# Altium PCB Telephone Circuit v1.0.PcbDoc (part 4 of 5)
Units mil, origin at the board's own origin, x right, y up, seen from the top; angles counter-clockwise.
Board outline 3149.61 x 2952.76 mil, 2 copper layers (Top Layer, Bottom Layer), stack 61.855 mil thick; 194 components, 119 nets, 557 pads, 213 vias.
Unrouted connection lines stored in the file: 77.
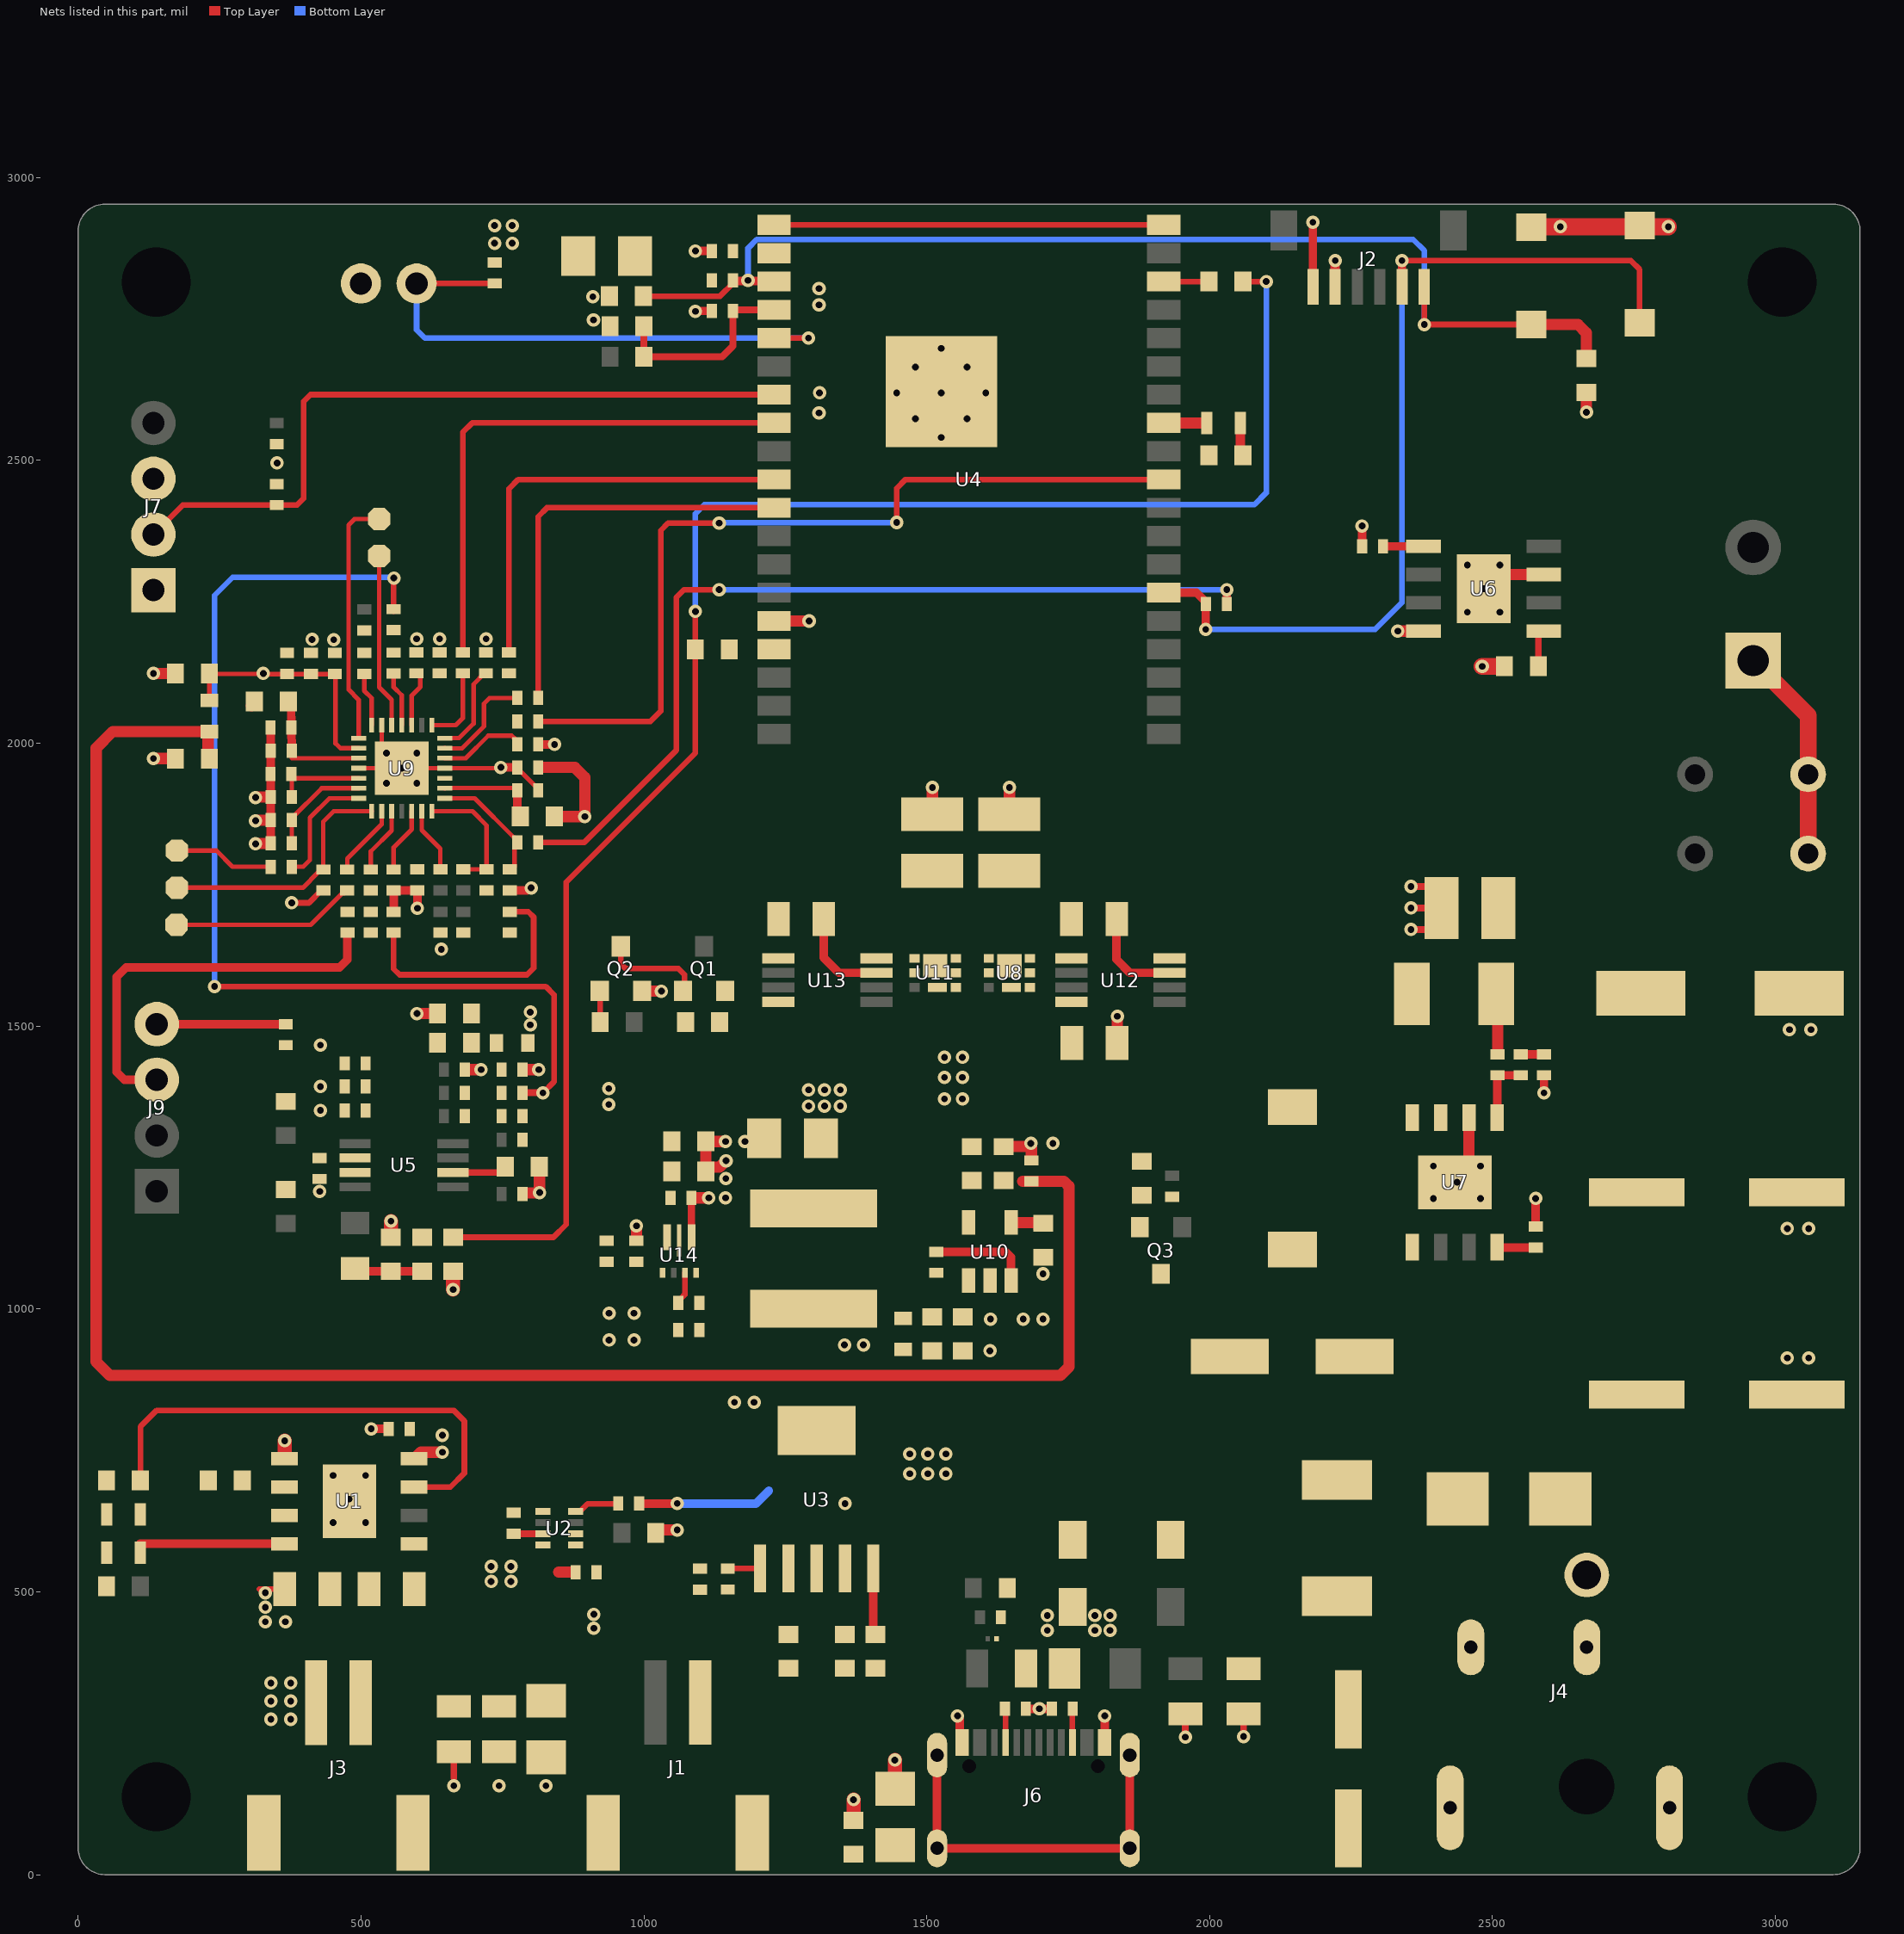
[diagram p2: the nets of this part, all layers, seen from the top]

## Part data (continued)
R34: library part RC0402FR-076K2L, "RES 6.2K OHM 1% 1/16W 0402", Case Code (Imperial)=0402, Case Code (Metric)=1005, LCSC Part Number=C137946, Manufacturer=Yageo, Max Operating Temperature=155°C, Max Power Dissipation=63mW, Min Operating Temperature=-55°C, Package Quantity=1, Resistance Tolerance=1%, Resistor Type="Thick Film", Temperature Coefficient=100ppm/°C, Voltage Rating=50V, Case/Package=0402, ComponentLink1Description=https://datasheet.ciiva.com/7850/1018594-7850076.pdf?src-supplier=Element14, ComponentLink1URL=https://datasheet.ciiva.com/7850/1018594-7850076.pdf?src-supplier=Element14, ComponentLink2Description=https://datasheet.ciiva.com/7850/1018594-7850077.pdf?src-supplier=Element14, ComponentLink2URL=https://datasheet.ciiva.com/7850/1018594-7850077.pdf?src-supplier=Element14, Construction=Rectangular, Depth=0.5mm, Features="Moisture Resistant", Height=0.016inch, Item Type=Resistors, Lead Free="Lead Free", Length=1mm, Manufacturer Part Number=RC0402FR-076K2L, Military Standard=Not, Number of Terminations=2, Packaging="Tape and Reel", Power Rating=63mW, Pricing="100=0.034, 1000=0.032, 2500=0.031, 5000=0.028, 10000=0.026 (DKK)", Reach SVHC Compliant=Unknown, RoHS=Yes, RoHS Compliant=Yes, Series=RC, Stock=13400, Supplier=Rs, Termination=SMD/SMT, Tolerance=1%, Voltage Rating (DC)=50V, Width=0.02inch
R35: library part ERJ-2GEJ132X, "RES SMD 1.3K OHM 5% 1/10W 0402"
R36: library part 0402WGD8060TCE, "62.5mW Thick Film Resistors 50V ±100ppm/℃ ±0.5% 806Ω 0402 Chip Resistor - Surface Mount ROHS", LCSC Part Number=C423268, Manufacturer=UNI-ROYAL, Package=0402, ComponentLink1Description=LCSC, ComponentLink1URL=https://www.lcsc.com/product-detail/Chip-Resistor-Surface-Mount_UNI-ROYAL-Uniroyal-Elec-0402WGD8060TCE_C423268.html, Item Type=Resistor, Manufacturer Part Number=0402WGD8060TCE
R37: library part CRCW12060000Z0EA, "RES SMD 0 OHM JUMPER 1/4W 1206", Case Code (Imperial)=1206, Case Code (Metric)=3216, LCSC Part Number=C190124, Manufacturer=Vishay, Max Operating Temperature=155°C, Max Power Dissipation=250mW, Min Operating Temperature=-55°C, Package Quantity=5000, Ratings=AEC-Q200, Resistor Type="Thick Film", Temperature Coefficient=100ppm/°C, Tolerance=1%, Voltage Rating=200V, Case/Package=1206, ComponentLink1Description=https://datasheet.ciiva.com/7841/1720486-7841862.pdf?src-supplier=Element14, ComponentLink1URL=https://datasheet.ciiva.com/7841/1720486-7841862.pdf?src-supplier=Element14, Construction=Rectangular, Contact Plating=Tin, Depth=1.6mm, Features="Automotive AEC-Q200", Height=0.55mm, Item Type=Resistor, Lead Free=5697LeadFree, Length=3.2mm, Manufacturer Part Number=CRCW12060000Z0EA, Military Standard=Not, Number of Terminations=2, Packaging="Tape and Reel", Power Rating=250mW, Pricing="1=0.1, 10=0.039, 50=0.039, 100=0.018, 1000=0.013, 10000=0.007 (USD)", Radiation Hardening=No, Reach SVHC Compliant=Unknown, RoHS=Yes, RoHS Compliant=Yes, Series=CRCW, Stock=852938, Supplier=Mouser, Technology="THICK FILM", Termination=SMD/SMT, Voltage Rating (DC)=200V, Weight=0.000353oz, Width=1.6mm
R39: library part RC0603FR-0747RL, "RES SMD 47OHM 0.1W 0603", Case Code (Imperial)=0603, Case Code (Metric)=1608, LCSC Part Number=C114623, Manufacturer=Yageo, Max Operating Temperature=155°C, Max Power Dissipation=100mW, Min Operating Temperature=-55°C, Package Quantity=1, Resistance Tolerance=1%, Resistor Type="Thick Film", Supplier Part Number 1=311-47.0HRCT-ND, Temperature Coefficient=100ppm/°C, Voltage Rating=75V, Voltage Rating (DC)=50V, Case/Package=0603, Category="Chip SMD Resistors", ComponentLink1Description=https://datasheet.ciiva.com/2453/pyu-r-int-thick-7-2453922.pdf?src-supplier=Digi-Key, ComponentLink1URL=https://datasheet.ciiva.com/2453/pyu-r-int-thick-7-2453922.pdf?src-supplier=Digi-Key, ComponentLink2Description=https://datasheet.ciiva.com/2453/pyu-r-int-thick-7-2453923.pdf?src-supplier=Digi-Key, ComponentLink2URL=https://datasheet.ciiva.com/2453/pyu-r-int-thick-7-2453923.pdf?src-supplier=Digi-Key, ComponentLink3Description=https://datasheet.ciiva.com/2453/pyu-r-int-thick-7-2453924.pdf?src-supplier=Digi-Key, ComponentLink3URL=https://datasheet.ciiva.com/2453/pyu-r-int-thick-7-2453924.pdf?src-supplier=Digi-Key, ComponentLink4Description=https://datasheet.ciiva.com/7746/443971-7746363.pdf?src-supplier=Element14, ComponentLink4URL=https://datasheet.ciiva.com/7746/443971-7746363.pdf?src-supplier=Element14, ComponentLink5Description=https://datasheet.ciiva.com/7746/443971-7746364.pdf?src-supplier=Element14, ComponentLink5URL=https://datasheet.ciiva.com/7746/443971-7746364.pdf?src-supplier=Element14, ComponentLink6Description=https://datasheet.ciiva.com/46440/1868787-46440908.pdf?src-supplier=Element14, ComponentLink6URL=https://datasheet.ciiva.com/46440/1868787-46440908.pdf?src-supplier=Element14, Construction=Rectangular, Depth=0.8mm, Features="Moisture Resistant", Height=0.022inch, Lead Free="Lead Free", Length=1.6mm, Manufacturer Part Number=RC0603FR-0747RL, Military Standard=Not, Number of Pins=2, Number of Terminations=2, Packaging="Tape and Reel", Power Rating=100mW, Pricing 1="1=0.10000, 10=0.02400, 100=0.00970, 1000=0.00436, 2500=0.00378 (USD)", REACH SVHC=Unknown, Resistance=47R, RoHS=Yes, RoHS Compliant=Yes, Series=RC, Size Code=0603, Stock 1=596562, Supplier 1=Digi-Key, Termination=SMD/SMT, Tolerance=1%, Weight=7.1E-05oz, Width=0.8mm
R40: library part RC0603FR-074R7L, "RES 4.7 OHM 1% 1/10W 0603", Case Code (Imperial)=0603, Case Code (Metric)=1608, LCSC Part Number=C137705, Manufacturer=Yageo, Max Operating Temperature=155°C, Max Power Dissipation=100mW, Min Operating Temperature=-55°C, Package Quantity=5000, Resistance Tolerance=1%, Resistor Type="Thick Film", Supplier Part Number 1=3598901, Temperature Coefficient=200ppm/°C, Voltage Rating=50V, Case/Package=0603, Category="Chip SMD Resistors", ComponentLink1Description=https://datasheet.ciiva.com/46440/1868787-46440910.pdf?src-supplier=Element14, ComponentLink1URL=https://datasheet.ciiva.com/46440/1868787-46440910.pdf?src-supplier=Element14, ComponentLink2Description=https://datasheet.ciiva.com/12555/rc0603-272842-12555071.pdf?src-supplier=Mouser, ComponentLink2URL=https://datasheet.ciiva.com/12555/rc0603-272842-12555071.pdf?src-supplier=Mouser, Features="Moisture Resistant", Height=0.45mm, Item Type=Resistor, Lead Free="Lead Free", Length=1.6mm, Manufacturer Part Number=RC0603FR-074R7L, Number of Terminations=2, Packaging="Tape and Reel", Pins=2, Power Rating=100mW, Pricing 1="5000=0.0036, 25000=0.0034, 125000=0.0032, 250000=0.0031, 750000=0.0029 (USD)", Reach SVHC Compliant=Unknown, RoHS=Yes, Series=RC, Stock 1=160000, Supplier 1="Future Electronics", Termination=SMD/SMT, Tolerance=1%, Voltage Rating (DC)=50V, Width=0.8mm
R42 R44: library part RC0402FR-07100RL, "RES 100 OHM 1% 1/16W 0402", Case Code (Imperial)=0402, Case Code (Metric)=1005, LCSC Part Number=C106232, Manufacturer=Yageo, Max Operating Temperature=155°C, Max Power Dissipation=63mW, Min Operating Temperature=-55°C, Power Rating=62.5mW, Resistance Tolerance=1%, Resistor Type="Thick Film", Supplier Part Number 1=603-RC0402FR-07100RL, Temperature Coefficient=100ppm/°C, Voltage Rating=50V, Case/Package=0402, Category="Chip SMD Resistors", ComponentLink1Description=https://datasheet.ciiva.com/11808/0900766b80c66297-11808765.pdf?src-supplier=RSComponents, ComponentLink1URL=https://datasheet.ciiva.com/11808/0900766b80c66297-11808765.pdf?src-supplier=RSComponents, ComponentLink2Description=https://datasheet.ciiva.com/7849/1784430-7849810.pdf?src-supplier=Element14, ComponentLink2URL=https://datasheet.ciiva.com/7849/1784430-7849810.pdf?src-supplier=Element14, ComponentLink3Description=https://datasheet.ciiva.com/28367/1018594-28367226.pdf?src-supplier=Element14, ComponentLink3URL=https://datasheet.ciiva.com/28367/1018594-28367226.pdf?src-supplier=Element14, ComponentLink4Description=https://datasheet.ciiva.com/22747/1018594-22747511.pdf?src-supplier=Element14, ComponentLink4URL=https://datasheet.ciiva.com/22747/1018594-22747511.pdf?src-supplier=Element14, ComponentLink5Description=https://datasheet.ciiva.com/12667/pyu-rc0402-51-rohs-l-6-r-12667957.pdf?src-supplier=Mouser, ComponentLink5URL=https://datasheet.ciiva.com/12667/pyu-rc0402-51-rohs-l-6-r-12667957.pdf?src-supplier=Mouser, ComponentLink6Description=https://datasheet.ciiva.com/15189/getdatasheetpartid-329466-15189335.pdf?src-supplier=Verical, ComponentLink6URL=https://datasheet.ciiva.com/15189/getdatasheetpartid-329466-15189335.pdf?src-supplier=Verical, ComponentLink7Description=https://datasheet.ciiva.com/16740/pyu-rc0402-51-rohs-l-6-r-16740566.pdf?src-supplier=Future+Electronics, ComponentLink7URL=https://datasheet.ciiva.com/16740/pyu-rc0402-51-rohs-l-6-r-16740566.pdf?src-supplier=Future+Electronics, Construction=Rectangular, Depth=0.5mm, Features="Moisture Resistant", Height=0.32mm, Item Type=Resistor, Lead Free="Lead Free", Length=1mm, Manufacturer Part Number=RC0402FR-07100RL, Military Standard=Not, Number of Pins=2, Number of Terminations=2, Packaging="Tape and Reel", Pricing 1="1=0.10000, 10=0.01200, 50=0.01200, 100=0.00500, 1000=0.00300, 2500=0.00200, 10000=0.00100 (USD)", REACH SVHC="No SVHC", Resistance=100R, RoHS=Yes, RoHS Compliant=Yes, Series=RC, Size Code=0402, Stock 1=699545, Supplier 1=Mouser, Technology="THICK FILM", Termination=SMD/SMT, Tolerance=1%, Voltage Rating (DC)=50V, Width=0.5mm
R52 R55: library part RC0402FR-07100KL, "RES 100K OHM 1% 1/16W 0402", Case Code (Imperial)=0402, Case Code (Metric)=1005, LCSC Part Number=C60491, Manufacturer=Yageo, Max Operating Temperature=155°C, Max Power Dissipation=63mW, Min Operating Temperature=-55°C, Package Quantity=1, Resistance=100kR, Resistance Tolerance=1%, Resistor Type="Thick Film", Supplier Part Number 1=603-RC0402FR-07100KL, Temperature Coefficient=100ppm/°C, Voltage Rating=50V, Case/Package=0402, Category="Chip SMD Resistors", ComponentLink1Description=https://datasheet.ciiva.com/11819/0900766b80c66297-11819452.pdf?src-supplier=RSComponents, ComponentLink1URL=https://datasheet.ciiva.com/11819/0900766b80c66297-11819452.pdf?src-supplier=RSComponents, ComponentLink2Description=https://datasheet.ciiva.com/22747/1018594-22747509.pdf?src-supplier=Element14, ComponentLink2URL=https://datasheet.ciiva.com/22747/1018594-22747509.pdf?src-supplier=Element14, ComponentLink3Description=https://datasheet.ciiva.com/2453/pyu-r-int-thick-7-2453362.pdf?src-supplier=Digi-Key, ComponentLink3URL=https://datasheet.ciiva.com/2453/pyu-r-int-thick-7-2453362.pdf?src-supplier=Digi-Key, ComponentLink4Description=https://datasheet.ciiva.com/2453/pyu-r-int-thick-7-2453363.pdf?src-supplier=Digi-Key, ComponentLink4URL=https://datasheet.ciiva.com/2453/pyu-r-int-thick-7-2453363.pdf?src-supplier=Digi-Key, ComponentLink5Description=https://datasheet.ciiva.com/2453/pyu-r-int-thick-7-2453361.pdf?src-supplier=Digi-Key, ComponentLink5URL=https://datasheet.ciiva.com/2453/pyu-r-int-thick-7-2453361.pdf?src-supplier=Digi-Key, ComponentLink6Description=https://datasheet.ciiva.com/12667/pyu-rc0402-51-rohs-l-6-r-12667930.pdf?src-supplier=Mouser, ComponentLink6URL=https://datasheet.ciiva.com/12667/pyu-rc0402-51-rohs-l-6-r-12667930.pdf?src-supplier=Mouser, ComponentLink7Description=https://datasheet.ciiva.com/15189/getdatasheetpartid-323696-15189334.pdf?src-supplier=Verical, ComponentLink7URL=https://datasheet.ciiva.com/15189/getdatasheetpartid-323696-15189334.pdf?src-supplier=Verical, Construction=Rectangular, Depth=0.5mm, Features="Moisture Resistant", Height=0.016inch, Item Type=Resistor, Lead Free="Lead Free", Length=0.039inch, Manufacturer Part Number=RC0402FR-07100KL, Military Standard=Not, Number of Terminations=2, Packaging="Tape and Reel", Power Rating=63mW, Pricing 1="1=0.10000, 10=0.01200, 50=0.01200, 100=0.00500, 1000=0.00300, 2500=0.00200, 10000=0.00100 (USD)", REACH SVHC="No SVHC", RoHS=Yes, RoHS Compliant=Yes, Series=RC, Stock 1=7759549, Supplier 1=Mouser, Technology="THICK FILM", Termination=SMD/SMT, Tolerance=1%, Width=0.02inch, Working Voltage=50V
R53: library part RC0603JR-070RL, "RES 0 OHM JUMPER 1/10W 0603", Case Code (Imperial)=0603, Case Code (Metric)=1608, LCSC Part Number=C95177, Manufacturer=Yageo, Max Operating Temperature=155°C, Max Power Dissipation=100mW, Min Operating Temperature=-55°C, Package Quantity=5000, Resistance=0mR, Resistance Tolerance=5%, Resistor Type="Thick Film", Supplier Part Number 1=311-0.0GRCT-ND, Temperature Coefficient=200ppm/°C, Tolerance=1%, Voltage Rating=50V, Case/Package=0603, Category="Chip SMD Resistors", Construction=Rectangular, Contact Plating=Tin,Matte, Depth=0.8mm, Features="Moisture Resistant", Height=0.45mm, Item Type=Resistor, Lead Free="Lead Free", Length=1.6mm, Manufacturer Part Number=RC0603JR-070RL, Military Standard=Not, Number of Pins=2, Number of Terminations=2, Packaging="Tape and Reel", Power Rating=100mW, Pricing 1="1=0.10000, 10=0.01700, 25=0.01240, 50=0.00960, 100=0.00700, 250=0.00536, 500=0.00430, 1000=0.00316 (USD)", Radiation Hardening=No, Reach SVHC Compliant="No SVHC", RoHS=Yes, RoHS Compliant=Yes, Series=RC, Size Code=0603, Stock 1=18081776, Supplier 1=Digi-Key, Technology="THICK FILM", Termination=SMD/SMT, Voltage Rating (DC)=50V, Width=0.8mm
R54: library part RC-02W7323FT, "62.5mW Thick Film Resistors ±1% ±200ppm/℃ 732kΩ 0402 Chip Resistor - Surface Mount ROHS", JLCPCB Part Number=C321608, Manufacturer="FH (Guangdong Fenghua Advanced Tech)", Package=Res-0402, Item Type=Resistor, Manufacturer Part Number=RC-02W7323FT
SW1 SW2: "Without bracket 50mA 4mm 100000 Times 12V 160gf 3mm 2mm Round Button Standing paste SPST SMD Tactile Switches ROHS", LCSC Part Number=C720477, Manufacturer=XUNPU, Package=SMD, ComponentLink1Description=LCSC, ComponentLink1URL=https://www.lcsc.com/product-detail/Tactile-Switches_XUNPU-TS-1088-AR02016_C720477.html?s_z=n_TS-1088-AR02016, Item Type="Tactile Switch", Manufacturer Part Number=TS-1088-AR02016
TP1 TP2 TP3 TP4 TP5: "Test Point ON", Item Type="Test Point", Manufacturer Part Number="TEST POINT 0.5mm Dia"
U1: "ESOP-8 Battery Management ICs ROHS", LCSC Part Number=C16581, Manufacturer=TOPPOWER, Package=ESOP-8, ComponentLink1Description=LCSC, ComponentLink1URL=https://www.lcsc.com/product-detail/Battery-Management-ICs_TOPPOWER-Nanjing-Extension-Microelectronics-TP4056-42-ESOP8_C16581.html, Item Type=IC, Manufacturer Part Number=TP4056-42-ESOP8
U2: "OR Controller N+1 ORing Controller N-Channel 2:1 SOT-583", LCSC Part Number=C3235556, Manufacturer="Texas Instruments", Supplier Part Number 1=595-LM66200DRLR, Category="Integrated Circuits (ICs)", Item Type=IC, Manufacturer Part Number=LM66200DRLR, Pricing 1="1=0.80000, 10=0.70000, 50=0.65800, 100=0.53700, 1000=0.34000, 10000=0.30700 (USD)", RoHS=No, Stock 1=11717, Supplier 1=Mouser
U3: "IC REG LINEAR 3.3V 1A SOT223-6", LCSC Part Number=C485803, Manufacturer="Texas Instruments", Supplier Part Number=595-TPS79633DCQR, Category="Voltage Regulators - Linear", ComponentLink1Description=https://datasheet.ciiva.com/2045/tps79601-2045264.pdf?src-supplier=Digi-Key, ComponentLink1URL=https://datasheet.ciiva.com/2045/tps79601-2045264.pdf?src-supplier=Digi-Key, ComponentLink2Description=https://datasheet.ciiva.com/22704/1846966-22704703.pdf?src-supplier=Element14, ComponentLink2URL=https://datasheet.ciiva.com/22704/1846966-22704703.pdf?src-supplier=Element14, ComponentLink3Description=https://datasheet.ciiva.com/41462/001015136-da-01-en-ic-reg-ldo-3-3v-1-tps79633dcqr-sot-6-tid-41462982.pdf?src-supplier=Conrad, ComponentLink3URL=https://datasheet.ciiva.com/41462/001015136-da-01-en-ic-reg-ldo-3-3v-1-tps79633dcqr-sot-6-tid-41462982.pdf?src-supplier=Conrad, Item Type=IC, Length=6.5mm, Manufacturer Part Number=TPS79633DCQR, Pricing="1=3.24, 10=2.75, 50=2.75, 100=2.39, 1000=1.72, 10000=1.56 (USD)", RoHS=Yes, Stock=3089, Supplier=Mouser, Thickness=1.6mm, Width=3.5mm
U4: "RF TXRX MODULE BT PCB TRACE SMD", LCSC Part Number=C529589, Manufacturer="Espressif Systems", Supplier Part Number=1965-ESP32-WROVER-E-N16R8CT-ND, Category=Uncategorized, Item Type=Module, Manufacturer Part Number=ESP32-WROVER-E-N16R8, Pricing="1=3.28 (USD)", RoHS=No, Stock=11720, Supplier=Digi-Key
U5: "3Wx1@4Ω Class D MSOP-8 Audio Power OpAmps ROHS", LCSC Part Number=C189961, Manufacturer="Shenzhen Nsiway Tech", Package=MSOP-8, ComponentLink1Description=LCSC, ComponentLink1URL=https://www.lcsc.com/product-detail/Audio-Power-OpAmps_Shenzhen-Nsiway-Tech-NS4150B_C189961.html, Item Type=IC, Manufacturer Part Number=NS4150B
U6: "48-V, 3.5-A H BRIDGE MOTOR DRIVE", LCSC Part Number=C5218844, Manufacturer="Texas Instruments", Height=1.7mm, Item Type=IC, Length=4.89mm, Manufacturer Part Number=DRV8251ADDAR, Pins=8NUMBER, Pricing="1=1.78, 10=1.309, 25=1.1904, 100=1.0602, 250=0.99812, 500=0.96074, 1000=0.92996 (USD)", RoHS=No, Supplier=Digikey, Thickness=1.48mm, Width=3.9mm
U7: "Boost type Adjustable 500mA 3V~60V 3V~60V ESOP-8 DC-DC Converters ROHS", LCSC Part Number=C5280693, Manufacturer=Legend-Si, Package=ESOP-8, ComponentLink1Description=LCSC, ComponentLink1URL=https://www.lcsc.com/product-detail/DC-DC-Converters_Legend-Si-LGS6302EP_C5280693.html, Item Type=IC, Manufacturer Part Number=LGS6302EP
U8 U11: "30V 5A 2.3W 30mΩ@4A,8V null WSON-6 MOSFETs ROHS", LCSC Part Number=C2863837, Manufacturer="Texas Instruments", Supplier Part Number=595-CSD17313Q2, Category=MOSFETs, ComponentLink1Description=https://datasheet.ciiva.com/6388/csd17313q2-6388183.pdf?src-supplier=Digi-Key, ComponentLink1URL=https://datasheet.ciiva.com/6388/csd17313q2-6388183.pdf?src-supplier=Digi-Key, ComponentLink2Description=https://datasheet.ciiva.com/4438/slps260b-128048-4438543.pdf?src-supplier=Mouser, ComponentLink2URL=https://datasheet.ciiva.com/4438/slps260b-128048-4438543.pdf?src-supplier=Mouser, ComponentLink3Description=https://datasheet.ciiva.com/1255/csd17313q2-1255358.pdf?src-supplier=Newark, ComponentLink3URL=https://datasheet.ciiva.com/1255/csd17313q2-1255358.pdf?src-supplier=Newark, ComponentLink4Description=https://datasheet.ciiva.com/7968/1536237-7968249.pdf?src-supplier=Element14, ComponentLink4URL=https://datasheet.ciiva.com/7968/1536237-7968249.pdf?src-supplier=Element14, Item Type=IC, Manufacturer Part Number=CSD17313Q2, Pricing="1=0.59, 10=0.502, 50=0.502, 100=0.375, 1000=0.228, 10000=0.156 (USD)", RoHS=Yes, Stock=12528, Supplier=Mouser
U9: "QFN-28-EP(4x4) ADCs/DACs - Special Purpose ROHS", LCSC Part Number=C365736, Manufacturer=Everest-semi, Package=QFN-28-EP(4x4), ComponentLink1Description=LCSC, ComponentLink1URL=https://www.lcsc.com/product-detail/ADCs-DACs-Special-Purpose_Everest-semi-Everest-Semiconductor-ES8388_C365736.html, Item Type=IC, Manufacturer Part Number=ES8388
U10: "IC REG LDO 3.3V 0.3A SOT23-5", Manufacturer=Richtek, Supplier Part Number=1028-1014-1-ND, Category="Voltage Regulators - Linear", ComponentLink1Description=https://datasheet.ciiva.com/2046/3d3futf-83fb3frfm5mtkzlte2lnbkzg3d3d3f3d-2046896.pdf?src-supplier=Digi-Key, ComponentLink1URL=https://datasheet.ciiva.com/2046/3d3futf-83fb3frfm5mtkzlte2lnbkzg3d3d3f3d-2046896.pdf?src-supplier=Digi-Key, ComponentLink2Description=https://datasheet.ciiva.com/28652/1782157-28652989.pdf?src-supplier=Element14, ComponentLink2URL=https://datasheet.ciiva.com/28652/1782157-28652989.pdf?src-supplier=Element14, Manufacturer Part Number=RT9193-33GB, Pricing="1=0.53, 10=0.454, 25=0.424, 100=0.3394, 250=0.31512, 500=0.26664, 1000=0.20604 (USD)", RoHS=Yes, Stock=7748, Supplier=Digi-Key
U12 U13: "IC SMART DIODE CTLR 8VSSOP", Case/Package=VSSOP, Manufacturer="Texas Instruments", Max Operating Temperature=125°C, Min Operating Temperature=-40°C, Operating Supply Current=0A, Package Quantity=2500, Quiescent Current=0pA, Supplier Part Number=595-LM74610QDGKRQ1, Category="Power Management ICs", ComponentLink1Description=http://www.ti.com/lit/ds/symlink/lm74610-q1.pdf?src-supplier=Digikey, ComponentLink1URL=http://www.ti.com/lit/ds/symlink/lm74610-q1.pdf?src-supplier=Digikey, Item Type=IC, Lead Free="Lead Free", Manufacturer Part Number=LM74610QDGKRQ1, Mounting Technology="Surface Mount", Packaging="Cut Tape", Pins=8, Pricing="1=2.47, 10=2.1, 50=2.1, 100=1.79, 1000=1.2, 10000=1.08 (USD)", RoHS=Yes, RoHS Compliant=Yes, Series="Automotive, AEC-Q100", Stock=4920, Supplier=Mouser, Weight=0.005997oz
U14: "8-A boost converter with 0.5-V ultra-low input voltage 7-VQFN-HR -40 to 125", LCSC Part Number=C915088, Manufacturer="Texas Instruments", Supplier Part Number 1=296-TPS61022RWURDKR-ND, Category="Voltage Regulators - Switching", ComponentLink1Description=LCSC, ComponentLink1URL=https://www.lcsc.com/product-detail/DC-DC-Converters_Texas-Instruments-TPS61022RWUR_C915088.html, Item Type=IC, Manufacturer Part Number=TPS61022RWUR, Pricing 1="1=1.88000, 10=1.68800, 25=1.59280, 100=1.35690, 250=1.27412, 500=1.11486, 1000=0.92374 (USD)", RoHS=Yes, Supplier 1=Digi-Key

## Free pads (board coordinates)
  round 0 hole 122.05 unplated: S22(137.8,137.8) S22(137.8,2814.96) S22(3011.81,137.8) S22(3011.81,2814.96)

## Via types
v1: diameter 23.62, hole 11.81, Top Layer to Bottom Layer, tented both sides, 213 vias

## Nets (pads, with @x,y where several pads share a name; then routed paths per layer and width w, separated by ;. In a path a pad name is that pad's centre, name@x,y a point inside that pad or via, vN(x,y) a via of type N, cw(c..) or ccw(c..) an arc to the next point about the centre after c; other vN are vias at no path point)
3.3V##: C30.2 C67.2 C69.2 C70.2 C71.2 FB3.2 R28.1 R39.1 R41.2 R43.2 U9.16 | length 692.1
  Top Layer w8: C67.2@231.73,2123.35 231.96,2123.12 FB3.2@231.96,2075.65 ; C67.2@232.56,2122.52 v1@328.58,2122.52 ; v1(327.25,2123.35) 328.58,2122.02 C69.2@414.17,2122.02 ; C70.2@369.28,2122.52 C69.2@411.28,2122.52 ; C69.2@411.78,2122.02 C69.2@414.17,2122.02 ; C30.2@453.67,2122.02 417.66,2122.02 C69.2@414.17,2122.02 ; C30.2@455.01,2122.02 455.01,1999.68 463.46,1991.23 U9.16@495.81,1991.23
  Top Layer w20: C71.2@815.79,1957.23 878.11,1957.23 895.52,1939.82 v1(895.52,1870.36) R39.1@841.64,1870.36
  other v1: 641.8,1635.71
3V3: C7.2 C13.2 C14.2 J2.1 R4.1 R6.2 R18.2 R19.2 R22.2 U3.4 U4.2 U6.4 | length 398.8
  Top Layer w15: R4.1@991.5,656 991.57,655.93 1058.81,655.93 v1(1058.88,656) ; J2.1@2182.42,2806.76 v1(2182.42,2921)
  Top Layer w20: v1(2332.5,2198.19) U6.4@2377.91,2198.19
  Bottom Layer w15: v1(1058.88,656) 1059.03,655.85 1198.04,655.85 1220.91,678.72 ; v1@1355.29,655.93 v1(1355.36,655.85)
  other v1: 351.65,2495.25 736,2883.87 767.13,2883.87 736,2915 767.13,2915
3V3#: C51.2 C52.2 C74.1 C76.1 FB3.1 R40.2 U10.5 | length 3494.6
  Top Layer w20: C74.1@229.73,1972.93 229.73,2020.53 61.08,2020.53 31.8,1991.25 31.8,906.61 55.75,882.66 1736.41,882.66 1751.28,897.54 1751.28,1216.79 1742.49,1225.58 1669.39,1225.58 ; FB3.1@231.96,2020.53 FB3.1@233.66,2022.23 ; R40.2@306.52,2066.01 311.52,2071.01 R40.2@311.52,2073.51
5V: C3.2 C4.2 C5.2 C63.2 D1.1 D2.1 LED1.1 LED2.1 U1.4 U1.8 U2.6 U8.4 U8.7 U12.4 | length 357.7
  Top Layer w10: 320.5,505 C3.2@364.98,505
  Top Layer w15: LED2.1@109.53,585 U1.4@364.98,585 ; D1.1@1757.77,592 D1.1@1760,594.23
  Top Layer w20: U1.8@594,735 605.72,746.72 v1(643.75,746.72)
  other v1: 1713.1,431.77 1797.14,431.77 1823.91,431.77 911.48,435.62 330.68,446.93 366.31,446.93 1713.1,458.17 1797.14,458.17 1823.91,458.17 911.48,460.19 330.68,472.56 330.68,498.2 643.75,776.72
5V_BOOST: C88.2 C89.2 C90.2 FB4.1 R54.2 U14.3
  other v1: 937.78,1361.49 937.78,1389.59 799.16,1501.94 799.16,1524.63
5V_BOOST#: C33.1 C40.1 C41.1 C49.2 R26.2 U5.6
A_CLK: C80.2 R47.2 U9.5 | length 154.3
  Top Layer w8: U9.5@648.01,1973.51 685.15,1973.51 724.91,2013.28 766.46,2013.28 771.14,2008.59 771.14,2002.88 C80.2@776.14,1997.88
A_LRCLK: C81.2 R48.2 U9.7 | length 161.5
  Top Layer w8: U9.7@648.01,2008.94 673.21,2008.94 698.99,2034.73 698.99,2104.19 717.16,2122.36 717.16,2123.53 C81.2@720.66,2123.53
AGND: C15.1 C30.1 C33.2 C34.1 C35.1 C38.1 C40.2 C41.2 C42.2 C43.2 C45.1 C48.1 C49.1 C50.1 C51.1 C52.1 C53.1 C54.1 C55.1 C67.1 C69.1 C70.1 C71.1 C72.1 C73.2 C74.2 C75.2 C76.2 C77.1 C78.1 C79.1 C80.1 C81.1 C82.1 C83.1 C84.1 C85.1 C86.1 C87.1 C88.1 C89.1 C90.1 R23.2 R37.2 R45.2 R51.1 R52.1 R55.1 U5.7 U9.4 U9.13 U9.18 U9.29 U10.2 U14.1 U14.6 | length 1565.8
  Top Layer w8: U9.18@495.81,1955.79 v1(571.91,1955.79) ; U9.13@536.47,2031.9 536.47,1991.23 v1(545.16,1982.54) v1(571.91,1955.79) ; v1@747.15,1955.79 U9.4@648.01,1955.79 v1(571.91,1955.79) ; C71.1@776.14,1957.23 776.14,1953.73 780.14,1949.73 782.07,1949.73 807.94,1923.86 809.14,1923.86 813.14,1919.86 C72.1@813.14,1916.36
  Top Layer w10: v1(377.5,1717.77) 407.95,1717.77 429.77,1739.59 R52.1@433.27,1739.59 ; C55.1@1065.06,1018.02 1072.31,1025.28 U14.6@1072.31,1063.71
  Top Layer w13: U14.1@1084.13,1126.7 C90.1@1084.13,1196.15
  Top Layer w15: C73.2@340.02,2027.68 340.26,2027.44 340.26,1986.9 340.26,1945.8 340.26,1904.74 C83.1@340.26,1863.93 ; C82.1@340.09,1823.41 C83.1@340.09,1863.53 ; C35.1@557.67,1702.02 R45.2@557.67,1739.6 557.89,1739.82 599.4,1739.82 C78.1@599.62,1740.04 v1(599.62,1708.2) ; v1(747.15,1957.23) C71.1@776.14,1957.23 ; C79.1@762.92,1740.01 794.12,1740.03 798.28,1744.19 v1(800.62,1744.19) ; C80.1@813.14,1997.88 v1(841.89,1997.88)
  Top Layer w20: v1(133,1972.93) C74.2@171.73,1972.93 ; v1(133,2123.35) C67.1@171.73,2123.35 ; v1(313.57,1822.07) 314.26,1822.77 338.27,1822.77 C82.1@338.37,1822.87 ; v1(313.57,1863.01) 314.26,1863.7 335.27,1863.7 335.38,1863.81 C83.1@338.37,1863.81 ; v1(313.57,1903.94) 314.26,1904.64 335.27,1904.64 335.38,1904.74 C84.1@338.37,1904.74 ; v1(598.81,1522.16) C15.1@635.12,1522.16 ; C45.1@687.38,1422.99 v1(712.31,1422.99) ; R51.1@788.17,1203.26 789.82,1204.91 815.04,1204.91 v1(815.73,1205.61) 815.36,1205.97 815.36,1250.84 C50.1@815,1251.2 ; C48.1@789.26,1423 v1(814.19,1423) ; R55.1@986.78,1122.7 v1(986.78,1147) v1@986.78,1148 ; C90.1@1086.91,1196.37 v1(1114.74,1196.37) ; v1(1144.24,1296) C89.1@1109.41,1296 C88.1@1109.41,1242.89 1109.41,1245.39 1114.41,1250.39 1133.64,1250.39 v1(1145.19,1261.94) ; C52.1@1635.82,1286.96 1684.82,1286.96 C76.2@1684.82,1265.57
  other v1: 1611.56,925.87 938.3,945 982.56,945 1612.56,981.99 1670.56,981.99 1705.56,981.99 938.3,992.5 982.56,992.5 1705.56,1062 1144.24,1196.37 427,1207.74 1144.75,1230.62 1683.82,1292.64 1723.06,1292.64 1178.67,1296 428.34,1351.02 428.34,1393.02 428.34,1466.43 545.16,1929.05 598.65,1929.05 598.65,1982.54 413.54,2183.4 451.94,2182.89 598.37,2184.41 638.92,2184.41 720.92,2184.41
BAT_ADC: C18.2 R11.2 R12.2 U4.4 | length 355.8
  Top Layer w12: R12.2@1000,2737 R11.2@1000,2683.17 1138.41,2683.17 1157.25,2702.01 1157.25,2766.15 U4.4@1230.02,2766.15
BATT: C1.2 C2.2 C23.2 C24.2 C25.2 J3.2 Q1.2 R14.1 U1.5 U2.3 U11.4 U11.7 U13.4 | length 47.8
  Top Layer w12: C2.2@769.88,602.58 U2.3@817.68,602.58
  other v1: 729.93,518.2 764.86,518.2 729.93,544.71 764.86,544.71 1531.23,1371.4 1562.99,1371.4 1531.23,1409.4 1562.99,1409.4 1531.23,1444.77 1562.99,1444.77
"boost power_OR": C64.2 C65.2 R53.2 U8.1 U8.2 U8.5 U8.6 U8.8 U11.1 U11.2 U11.5 U11.6 U11.8 U12.8 U13.8
BOOST_VIN: C59.1 C60.2 L1.2 Q3.3 U7.5 U7.8 | length 68.5
  Top Layer w12: U7.8@2508.3,1108.62 U7.8@2508.3,1109.22
  Top Layer w15: U7.8@2508.3,1108.62 C60.2@2576.21,1108.62
C_ROUT1: C31.1 U9.11 | length 97
  Top Layer w8: C31.1@557.66,2123.02 557.66,2099.03 571.91,2084.79 U9.11@571.91,2031.9
C_ROUT2: C32.1 U9.14 | length 96
  Top Layer w8: C32.1@505.67,2122.52 505.67,2092.71 518.76,2079.61 U9.14@518.76,2031.9
CHRG: R3.2 U1.7 | length 878.4
  Top Layer w10: R3.2@110,696.82 110,791.75 138.88,820.64 663.81,820.64 682.68,801.76 682.68,709.68 658,685 U1.7@594,685
"Coil power_42V": C56.1 C57.1 C58.2 C61.1 C62.2 D5.1 R33.2 U6.5 | length 174.8
  Top Layer w12: D5.1@2506.8,1557 D5.1@2508.98,1554.82 ; C58.2@2581,2135.85 2581,2192.38 2586.81,2198.19 U6.5@2590.51,2198.19
  Top Layer w20: R33.2@2508.98,1451.54 D5.1@2508.98,1554.82
DAC_ROUT1: C46.1 R24.2 | length 1904.4
  Top Layer w10: v1(241,1570) 826.23,1570 841,1555.23 841,1401.47 v1(821.53,1382) ; R24.2@557.83,2233.03 557.83,2291.83 v1(558,2292)
  Top Layer w12: C46.1@785.49,1382 v1(821.53,1382)
  Bottom Layer w10: v1(241,1570) 241,2261.18 273,2293.18 556.82,2293.18 v1(558,2292)
DC_Barrel_5V: C21.1 C22.2 D1.2 F1.2
DSDIN: R49.2 U9.6 | length 188.8
  Top Layer w8: U9.6@648.01,1991.23 648.29,1990.94 678.54,1990.94 717.28,2029.68 717.28,2070.06 727.25,2080.03 R49.2@776.16,2080.03
DSDOUT: R50.2 U9.8 | length 139.2
  Top Layer w8: U9.8@625.06,2031.9 667.56,2031.9 679.83,2044.17 R50.2@679.83,2123.54
DT1: R9.1 U4.36 | length 79.2
  Top Layer w10: U4.36@1919,2816.15 R9.1@1998.17,2816.15
DT2: R10.1 U4.16
EROTARY: J7.2 R18.1 U4.7 | length 1299.7
  Top Layer w10: J7.2@133,2369 185.08,2421.08 386.93,2421.08 398.59,2432.73 398.59,2603.95 410.79,2616.15 U4.7@1230.02,2616.15
ES8388_ADCVREF: C84.2 C85.2 U9.19 | length 161.7
  Top Layer w8: C85.2@377.02,1938.08 C85.2@377.5,1938.08 ; C85.2@377.02,1945.8 C85.2@377.5,1945.32 ; C84.2@377.5,1904.87 C85.2@377.5,1938.08 ; C85.2@378.74,1944.08 C85.2@377.5,1945.32 ; U9.19@495.81,1938.08 C85.2@377.5,1938.08 ; C85.2@377.5,1938.08 C85.2@377.5,1945.32
ES8388_CE: R45.1 U9.26 | length 116.3
  Top Layer w8: R45.1@557.67,1776.6 557.67,1815.97 589.62,1847.92 U9.26@589.62,1879.69
ES8388_LIN1_P: C36.2 U9.24 | length 118.4
  Top Layer w8: C36.2@517.19,1776.58 517.19,1808.59 554.19,1845.59 U9.24@554.19,1879.69
ES8388_LIN2: R52.2 TP2.1 U9.22 | length 454.8
  Top Layer w8: TP2.1@174.31,1744.62 397.33,1744.62 424.3,1771.59 428.27,1771.59 R52.2@433.27,1776.59 ; R52.2@425.43,1776.59 428.27,1776.59 433.27,1781.59 433.27,1861.13 451.83,1879.69 U9.22@518.76,1879.69
ES8388_RIN1: C37.2 U9.23 | length 128.3
  Top Layer w8: C37.2@475.58,1776.58 475.58,1795.84 536.47,1856.73 U9.23@536.47,1879.69
ES8388_RIN2: C39.2 U9.21 | length 212.2
  Top Layer w8: C39.2@377.5,1781.58 397.85,1781.58 409.73,1793.46 409.73,1868.18 444.19,1902.65 U9.21@495.81,1902.65
ES8388_SCL: C77.2 R42.2 U9.28 | length 223.6
  Top Layer w8: U9.28@625.06,1879.69 696.95,1879.69 721.91,1854.74 721.91,1781.4 717.54,1777.03 R42.2@680.66,1777.03
ES8388_SDA: C78.2 R44.2 U9.27 | length 115.9
  Top Layer w8: U9.27@607.34,1879.69 607.34,1846.25 640.03,1813.56 R44.2@640.03,1777.34
ES8388_VMID: C82.2 C83.2 U9.20 | length 190.7
  Top Layer w8: C82.2@377.5,1823 C83.2@377.5,1857.93 ; C83.2@377.5,1863.93 C83.2@377.5,1857.93 ; U9.20@495.81,1920.36 430.43,1920.36 377.5,1867.43 C83.2@377.5,1857.93
ES8388_VREF: C86.2 C87.2 U9.10 | length 101.1
  Top Layer w8: U9.10@589.62,2031.9 589.62,2084.55 604.81,2099.73 604.81,2117.53 598.81,2123.53 C87.2@598.1,2123.53
ESP-EN: C11.2 C12.2 J2.6 R6.1 SW1.2 U4.3 | length 2047.4
  Top Layer w10: C11.2@999,2790.15 1134.75,2790.15 1157.25,2812.65 1157.25,2816.15 R6.1@1158.18,2817.07 ; v1@1183.07,2817.07 v1(1184,2818) ; J2.6@2379.33,2806.69 v1(2379.33,2740.13) SW1.2@2568.4,2740.13
  Top Layer w15: R6.1@1158.18,2817.07 v1@1183.07,2817.07 ; v1(1184,2818) 1184.93,2817.07 1229.1,2817.07 U4.3@1230.02,2816.15
  Top Layer w20: SW1.2@2568.4,2740.13 2651.07,2740.13 2665.63,2725.57 C12.2@2665.63,2679.96
  Bottom Layer w10: v1(1184,2818) 1184,2875 1199.37,2890.37 2359.82,2890.37 2379.33,2870.85 v1(2379.33,2740.13)
GND: C1.1 C2.1 C3.1 C4.1 C5.1 C6.1 C7.1 C8.1 C9.1 C10.1 C11.1 C12.1 C13.1 C14.1 C16.1 C17.1 C18.1 C21.2 C22.1 C23.1 C24.1 C25.1 C26.1 C27.2 C28.2 C29.1 C56.2 C57.2 C58.1 C59.2 C60.1 C61.2 C62.1 C63.1 C64.1 C65.1 D4.2 J1.3 J1.4 J2.2 J3.1 J3.3 J3.4 J4.1 J4.2 J4.3 J4.6 J6.A1/B12 J6.B1/A12 J7.1 J7.3 J8.1 Q2.2 R1.2 R12.1 R13.1 R16.2 R17.2 R20.1 R35.1 R36.1 R37.1 SW1.1 SW2.1 U1.1 U1.3 U1.9 U2.1 U2.4 U2.5 U3.3 U3.6 U4.1 U4.15 U4.38 U4.39 U6.7 U6.9 U7.2 U7.9 | length 2375.7
  Top Layer w8: C16.1@552.67,1126.7 C16.1@553.12,1127.15 ; C12.1@2665.63,2619.96 C12.1@2666,2619.58
  Top Layer w10: U4.1@1230.02,2916.15 U4.38@1919,2916.15
  Top Layer w12: C23.1@663.86,217.4 664,217.25 664,171 ; C29.1@1443.5,153 C29.1@1443.94,152.57 ; v1(1525.67,2619.33) U4.39@1525.67,2621.46 ; v1(1957,243) C26.1@1957,283.64 ; v1(2060,244.12) C22.1@2060,284.12 ; v1(2356,1670.64) C62.1@2410,1670.64 ; v1(2356,1708.64) C62.1@2410,1708.64 ; v1(2356,1746.64) C62.1@2410,1746.64 ; U7.9@2433.3,1223.72 U7.9@2458.3,1248.72
  Top Layer w15: v1(518,788) C4.1@549,788 ; v1@1091.15,2764.15 C18.1@1120.25,2764.15 ; v1(1091.15,2870.22) C14.1@1120.25,2870.22 ; v1(1554.27,280.62) 1554.27,278.28 1558.18,274.37 1558.18,237.93 J6.A1/B12@1560.91,235.21 ; R16.2@1676.98,293.12 v1(1698.98,293.12) R17.2@1721,293.12 R17.2@1721,292 ; J6.B1/A12@1814.46,233.62 v1(1814.46,280.62) ; R35.1@2269.5,2347.85 v1(2269.5,2384) ; C60.1@2576.21,1145.62 v1(2576.21,1195.23) ; v1(2590.87,1381.87) R36.1@2590.87,1413.15
  Top Layer w17: J2.2@2221.85,2806.69 v1@2221.85,2853.17
  Top Layer w20: 849.26,534.71 C5.1@875.88,534.71 ; Q2.2@997.78,1563.22 999.11,1561.9 1030.73,1561.9 v1(1030.95,1561.68) ; C6.1@1021,604 1021,604.24 1026,609.24 v1(1059,609.24) ; U4.15@1230.02,2216.15 v1@1292,2216.15 ; C65.1@1509.87,1874.45 v1(1509.87,1921.72) ; C64.1@1646.18,1874.45 v1(1646.18,1921.72) ; C63.1@1836.72,1470 v1(1836.72,1517.26) ; U7.9@2458.3,1248.72 U7.2@2458.3,1338.23 ; U6.9@2509.21,2298.19 U6.7@2590.51,2298.19 ; v1(2666,2585) C12.1@2666,2619.58
  Top Layer w25: U1.1@364.98,737.99 v1(365,767) ; C16.1@553.12,1127.15 v1(553.12,1155.02) ; C17.1@662.61,1066.7 662.79,1066.52 v1(662.79,1034.11) ; R20.1@1370.5,96.57 v1(1370.5,132.57) ; C29.1@1443.5,153 v1(1443.5,202.57)
  Top Layer w30: v1(2481.76,2135.85) C58.1@2519.5,2135.85 ; SW1.1@2568.4,2912.17 2569.13,2912.89 v1(2810.71,2912.89)
  other v1: 664,157 743.86,157 827,157 340.66,274.64 375.66,274.64 340.66,306.64 375.66,306.64 340.66,338.64 375.66,338.64 450.61,622.26 507.98,622.26 479.29,663.94 450.61,705.62 507.98,705.62 1469.82,708.54 1501.82,708.54 1533.82,708.54 1469.82,743.54 1501.82,743.54 1533.82,743.54 3020.95,913.22 3058.95,913.22 3020.95,1142.07 3058.95,1142.07 2395.56,1195.23 2478.92,1195.23 2437.24,1223.92 2395.56,1252.61 2478.92,1252.61 1291.09,1358.49 1319.19,1358.49 1347.3,1358.49 1291.09,1387.37 1319.19,1387.37 1347.3,1387.37 3024.85,1493.67 3062.85,1493.67 1292,2216 2455.52,2231.51 2512.9,2231.51 2484.21,2273.19 2455.52,2314.87 2512.9,2314.87 1525.67,2540.59 1479.99,2573.65 1571.35,2573.65 1309.49,2583.87 1310.31,2619.33 1446.93,2619.33 1604.41,2619.33 1479.99,2665.01 1571.35,2665.01 1525.67,2698.07 910.9,2748.19 1091.15,2763.34 1309.49,2774.86 909.9,2789.34 1309.49,2803.65 2222,2853.17 2619.84,2912.89
HEADSET_PICK: J8.2 R22.1 U4.5 | length 979.4
  Top Layer w10: J8.2@598.26,2812.69 R22.1@736,2812.69 ; U4.5@1230.02,2716.15 v1(1291,2716.15)
  Bottom Layer w10: J8.2@598.26,2812.69 598.26,2730.78 612.89,2716.15 v1(1291,2716.15)
I2S_DIN_IO26: R49.1 U4.11 | length 743.9
  Top Layer w10: R49.1@813.16,2080.03 813.16,2400.59 828.72,2416.15 U4.11@1230.02,2416.15
I2S_DOUT_IO35: R50.1 U4.8 | length 953.9
  Top Layer w10: R50.1@679.83,2160.54 679.83,2549.54 696.44,2566.15 U4.8@1237.87,2566.15
I2S_LRCK_IO25: R48.1 U4.10 | length 764.6
  Top Layer w10: R48.1@761.4,2160.54 761.4,2449.72 777.82,2466.15 U4.10@1230.02,2466.15
I2S_MCLK_IO0: R21.2 R46.1 | length 1584.5
  Top Layer w10: R46.1@813.14,1824.45 894.28,1824.45 1057,1987.17 1057,2257.33 1071.1,2271.43 v1@1131.74,2271.43
  Top Layer w15: R21.2@2030.19,2246.15 v1(2030.19,2271.43)
  Bottom Layer w10: v1(1133,2271.43) v1(2030.19,2271.43)
I2S_SCLK_IO5: R47.1 U4.29 | length 1505.4
  Top Layer w10: R47.1@813.14,2038.54 1011.4,2038.54 1029.86,2057 1029.86,2376.16 1042.7,2389 v1(1133,2389) ; v1(1446.99,2390.23) 1446.99,2450.71 1462.43,2466.15 U4.29@1919,2466.15
  Bottom Layer w10: v1(1133,2389) 1133.62,2389.62 1446.38,2389.62 v1(1446.99,2390.23)
IO0: J2.5 R21.1 SW2.2 U4.25 | length 1668.2
  Top Layer w10: v1(1993,2201.08) v1@1993.09,2201.17 ; R21.1@1993.09,2246.06 R21.1@1993.19,2246.15 ; v1(2339.96,2853.17) 2744.21,2853.17 2760,2837.37 SW2.2@2760,2743.07
  Top Layer w15: U4.25@1919,2266.15 1976.69,2266.15 1993.19,2249.65 R21.1@1993.19,2246.15 ; v1@1993.09,2201.17 R21.1@1993.09,2246.06 ; J2.5@2339.96,2806.69 v1(2339.96,2853.17)
  Bottom Layer w10: v1(1993,2201.08) 2292.37,2201.08 2339.96,2248.67 v1(2339.96,2853.17)
LDO_INPUT: C8.2 C9.2 C54.2 C55.2 FB2.2 J1.2 L2.1 R5.2 U3.2 U14.7
  other v1: 1160,835 1194.66,835 1354.46,936.39 1388,936.39
LED_IND: LED3.1 U4.31 | length 73.2
  Top Layer w20: U4.31@1919,2566.15 LED3.1@1992.2,2566.15
LOUT1: TP4.1 U9.12 | length 308.4
  Top Layer w8: TP4.1@532.14,2331.15 532.14,2099.03 554.19,2076.98 U9.12@554.19,2031.9
LOUT2: TP5.1 U9.15 | length 441.6
  Top Layer w8: U9.15@495.81,2010.23 495.81,2076.93 477.88,2094.85 477.88,2385.79 488.48,2396.4 TP5.1@532.14,2396.4
MCLK: C79.2 R46.2 U9.1 | length 217.4
  Top Layer w8: U9.1@648.01,1902.65 700.88,1902.65 770.57,1832.95 771.14,1832.95 776.14,1827.95 R46.2@776.14,1824.45 771.17,1819.47 771.17,1782.01 766.17,1777.01 C79.2@762.92,1777.01
Mic_IN+: J9.3 R30.1 | length 713.2
  Top Layer w15: J9.3@139,1405 81.69,1405 67.8,1418.89 67.8,1586.87 84.72,1603.79 462.21,1603.79 475.85,1617.43 R30.1@475.85,1665.02
NetC10_2: C10.2 U3.5 | length 116.5
  Top Layer w15: C10.2@1405.36,424.61 U3.5@1405.36,541.1
NetC15_2: C15.2 FB4.2 R26.1
NetC16_2: C16.2 R7.1 R8.2 | length 123.6
  Top Layer w15: R7.1@489.39,1071.7 489.39,1066.7 C16.2@552.67,1066.7 R8.2@608,1066.7
NetC17_2: C17.2 R8.1 R9.2 R10.2 | length 3001.7
  Top Layer w10: C17.2@656.61,1126.7 657.61,1126.7 840.11,1126.69 862.54,1149.12 862.54,1754.28 1091,1982.74 R10.2@1091,2166.15 v1(1091,2232.79) ; R9.2@2062.68,2816.15 v1(2100,2816.15)
  Bottom Layer w10: v1(1091,2232.79) 1091,2405.84 1106.87,2421.71 2079.16,2421.71 2100,2442.55 v1(2100,2816.15)
NetC19_2: C19.2 C20.2 J5.1 | length 382.9
  Top Layer w30: J5.1@2959.66,2145.06 J5.1@2960.66,2146.06 3057.96,2048.77 C20.2@3057.96,1944.88 C19.2@3057.96,1804.88
NetC29_2: C29.2 J6.S1 J6.S2 J6.S3 J6.S4 R20.2 | length 679.1
  Top Layer w10: J6.S2@1858.75,46.61 1867.61,46.61 J6.S2@1868,47
  Top Layer w15: J6.S4@1518.2,211.18 J6.S3@1518.2,46.61 J6.S2@1858.75,46.61 J6.S1@1858.75,211.18
NetC31_2: C31.2 R24.1
NetC32_2: C32.2 R25.1
NetC34_2: C34.2 C38.2 FB2.1 R38.2 U10.1
NetC35_2: C35.2 R28.2 R29.2 | length 456.9
  Top Layer w10: C35.2@557.67,1665.02 557.67,1601.06 568.06,1590.67 793.29,1590.67 805.14,1602.52 805.14,1692.62 795.75,1702.02 R28.2@762.92,1702.02
NetC36_1: C36.1 R29.1 R30.2
NetC37_1: C37.1 TP1.1 | length 326.7
  Top Layer w8: TP1.1@174,1679.02 411.05,1679.02 466.62,1734.58 470.58,1734.58 C37.1@475.58,1739.58
NetC39_1: C39.1 TP3.1 | length 177.7
  Top Layer w8: TP3.1@174.63,1810.22 244.24,1810.22 272.88,1781.58 C39.1@340.5,1781.58
NetC44_1: C44.1 R27.2
NetC46_2: C46.2 C47.2 C48.2
NetC47_1: C47.1 R31.2
NetC50_2: C50.2 U5.2 | length 92.4
  Top Layer w12: U5.2@662.61,1241.2 C50.2@755,1241.2
NetC53_2: C53.2 U10.4 | length 59.1
  Top Layer w10: C53.2@1693.04,1141.44 C53.2@1695.56,1141.44
  Top Layer w20: U10.4@1648.96,1152.62 C53.2@1705.56,1152.62
NetC66_1: C66.1 U12.1
NetC66_2: C66.2 U12.7 | length 167.8
  Top Layer w15: C66.2@1835.15,1681.04 1835.15,1617.88 1858.96,1594.06 U12.7@1929,1594.06 ; C66.2@1835.15,1691.04 C66.2@1835.77,1691.67
NetC68_1: C68.1 U13.1
NetC68_2: C68.2 U13.7 | length 172.8
  Top Layer w15: C68.2@1317.98,1689.24 1317.98,1620.68 1344.59,1594.06 U13.7@1411.2,1594.06
NetC72_2: C72.2 R39.2 U9.2 U9.3 | length 176.6
  Top Layer w8: U9.2@648.01,1920.36 648.34,1920.69 C72.2@776.14,1920.69 ; R39.2@776.14,1875.86 R39.2@781.64,1870.36
  Top Layer w15: R39.2@776.14,1875.86 C72.2@776.14,1916.36
NetC73_1: C73.1 C75.1 R40.1 U9.17 | length 209.5
  Top Layer w8: 377.51,1973.51 U9.17@495.81,1973.51
  Top Layer w15: R40.1@371.52,2073.51 376.53,2068.62 C73.1@377.02,2027.68 C75.1@377.51,1986.9
  Top Layer w20: R40.1@371.52,2071.01 R40.1@371.52,2073.51
NetD3_1: D3.1 J4.4
NetD3_2: D3.2 F1.1
NetD5_2: D5.2 L1.1 U7.3 U7.4
NetF2_2: F2.2 FB1.1
NetJ6_A5: J6.A5 R16.1 | length 55.8
  Top Layer w10: J6.A5@1639.27,233.62 R16.1@1639.27,289.41
NetJ6_B5: J6.B5 R17.1 | length 58.4
  Top Layer w10: J6.B5@1757.38,233.62 R17.1@1757.38,292
NetJ9_4: J9.4 R23.1 | length 228
  Top Layer w15: J9.4@139,1503.43 R23.1@366.99,1503.43
NetL2_2: L2.2 U14.2
NetLED1_2: LED1.2 R3.1
NetLED2_2: LED2.2 R2.1
NetLED3_2: LED3.2 R13.2 | length 59.2
  Top Layer w17: LED3.2@2054.21,2566.15 2054.21,2513.23 R13.2@2058.69,2508.76
NetQ1_1: Q1.1 Q2.3 R14.2 | length 181.1
  Top Layer w10: Q2.3@959.28,1640.87 959.28,1610 967.78,1601.5 1061.23,1601.5 1071.55,1591.18 1071.55,1564.77 Q1.1@1068.91,1562.13
NetQ2_1: Q2.1 R15.2 | length 55.4
  Top Layer w10: Q2.1@921.88,1562.13 922.78,1561.22 R15.2@922.78,1507.13
NetQ3_2: Q3.2 R32.2 R53.1
NetR1_1: R1.1 U1.2
NetR4_2: R4.2 U2.8 | length 80.3
  Top Layer w10: U2.8@879.58,642.21 880.63,643.25 888.29,643.25 900.32,655.28 R4.2@954.5,655.28
NetR5_1: R5.1 U3.1 | length 57.2
  Top Layer w10: R5.1@1148.21,541.1 U3.1@1205.36,541.1
NetR33_1: R33.1 R34.2 U7.1 | length 116.3
  Top Layer w15: U7.1@2508.3,1338.23 2508.3,1412.46 R33.1@2508.98,1413.15 R34.2@2550.09,1413.15
NetR34_1: R34.1 R36.2 | length 40.8
  Top Layer w15: R34.1@2550.09,1450.15 R36.2@2590.87,1450.15
NetR35_2: R35.2 U6.1 | length 71.6
  Top Layer w15: R35.2@2306.5,2347.85 R35.2@2308.49,2347.85 ; R35.2@2308.66,2348.02 2377.75,2348.02 U6.1@2377.91,2348.19
  Top Layer w20: R35.2@2308.49,2347.85 R35.2@2308.66,2348.02
NetR38_1: R38.1 U10.3 | length 177.7
  Top Layer w15: R38.1@1516.56,1100.94 1639.82,1100.94 1648.96,1091.8 U10.3@1648.96,1050.26
NetR54_1: R54.1 R55.2 U14.4